# Altium PCB esp32s3.PcbDoc (part 1 of 3)
Units mm, origin at the board's own origin, x right, y up, seen from the top; angles counter-clockwise.
Board outline 131.57 x 101.6 mm, 2 copper layers (Top Layer, Bottom Layer); 173 components, 144 nets, 578 pads, 813 vias.
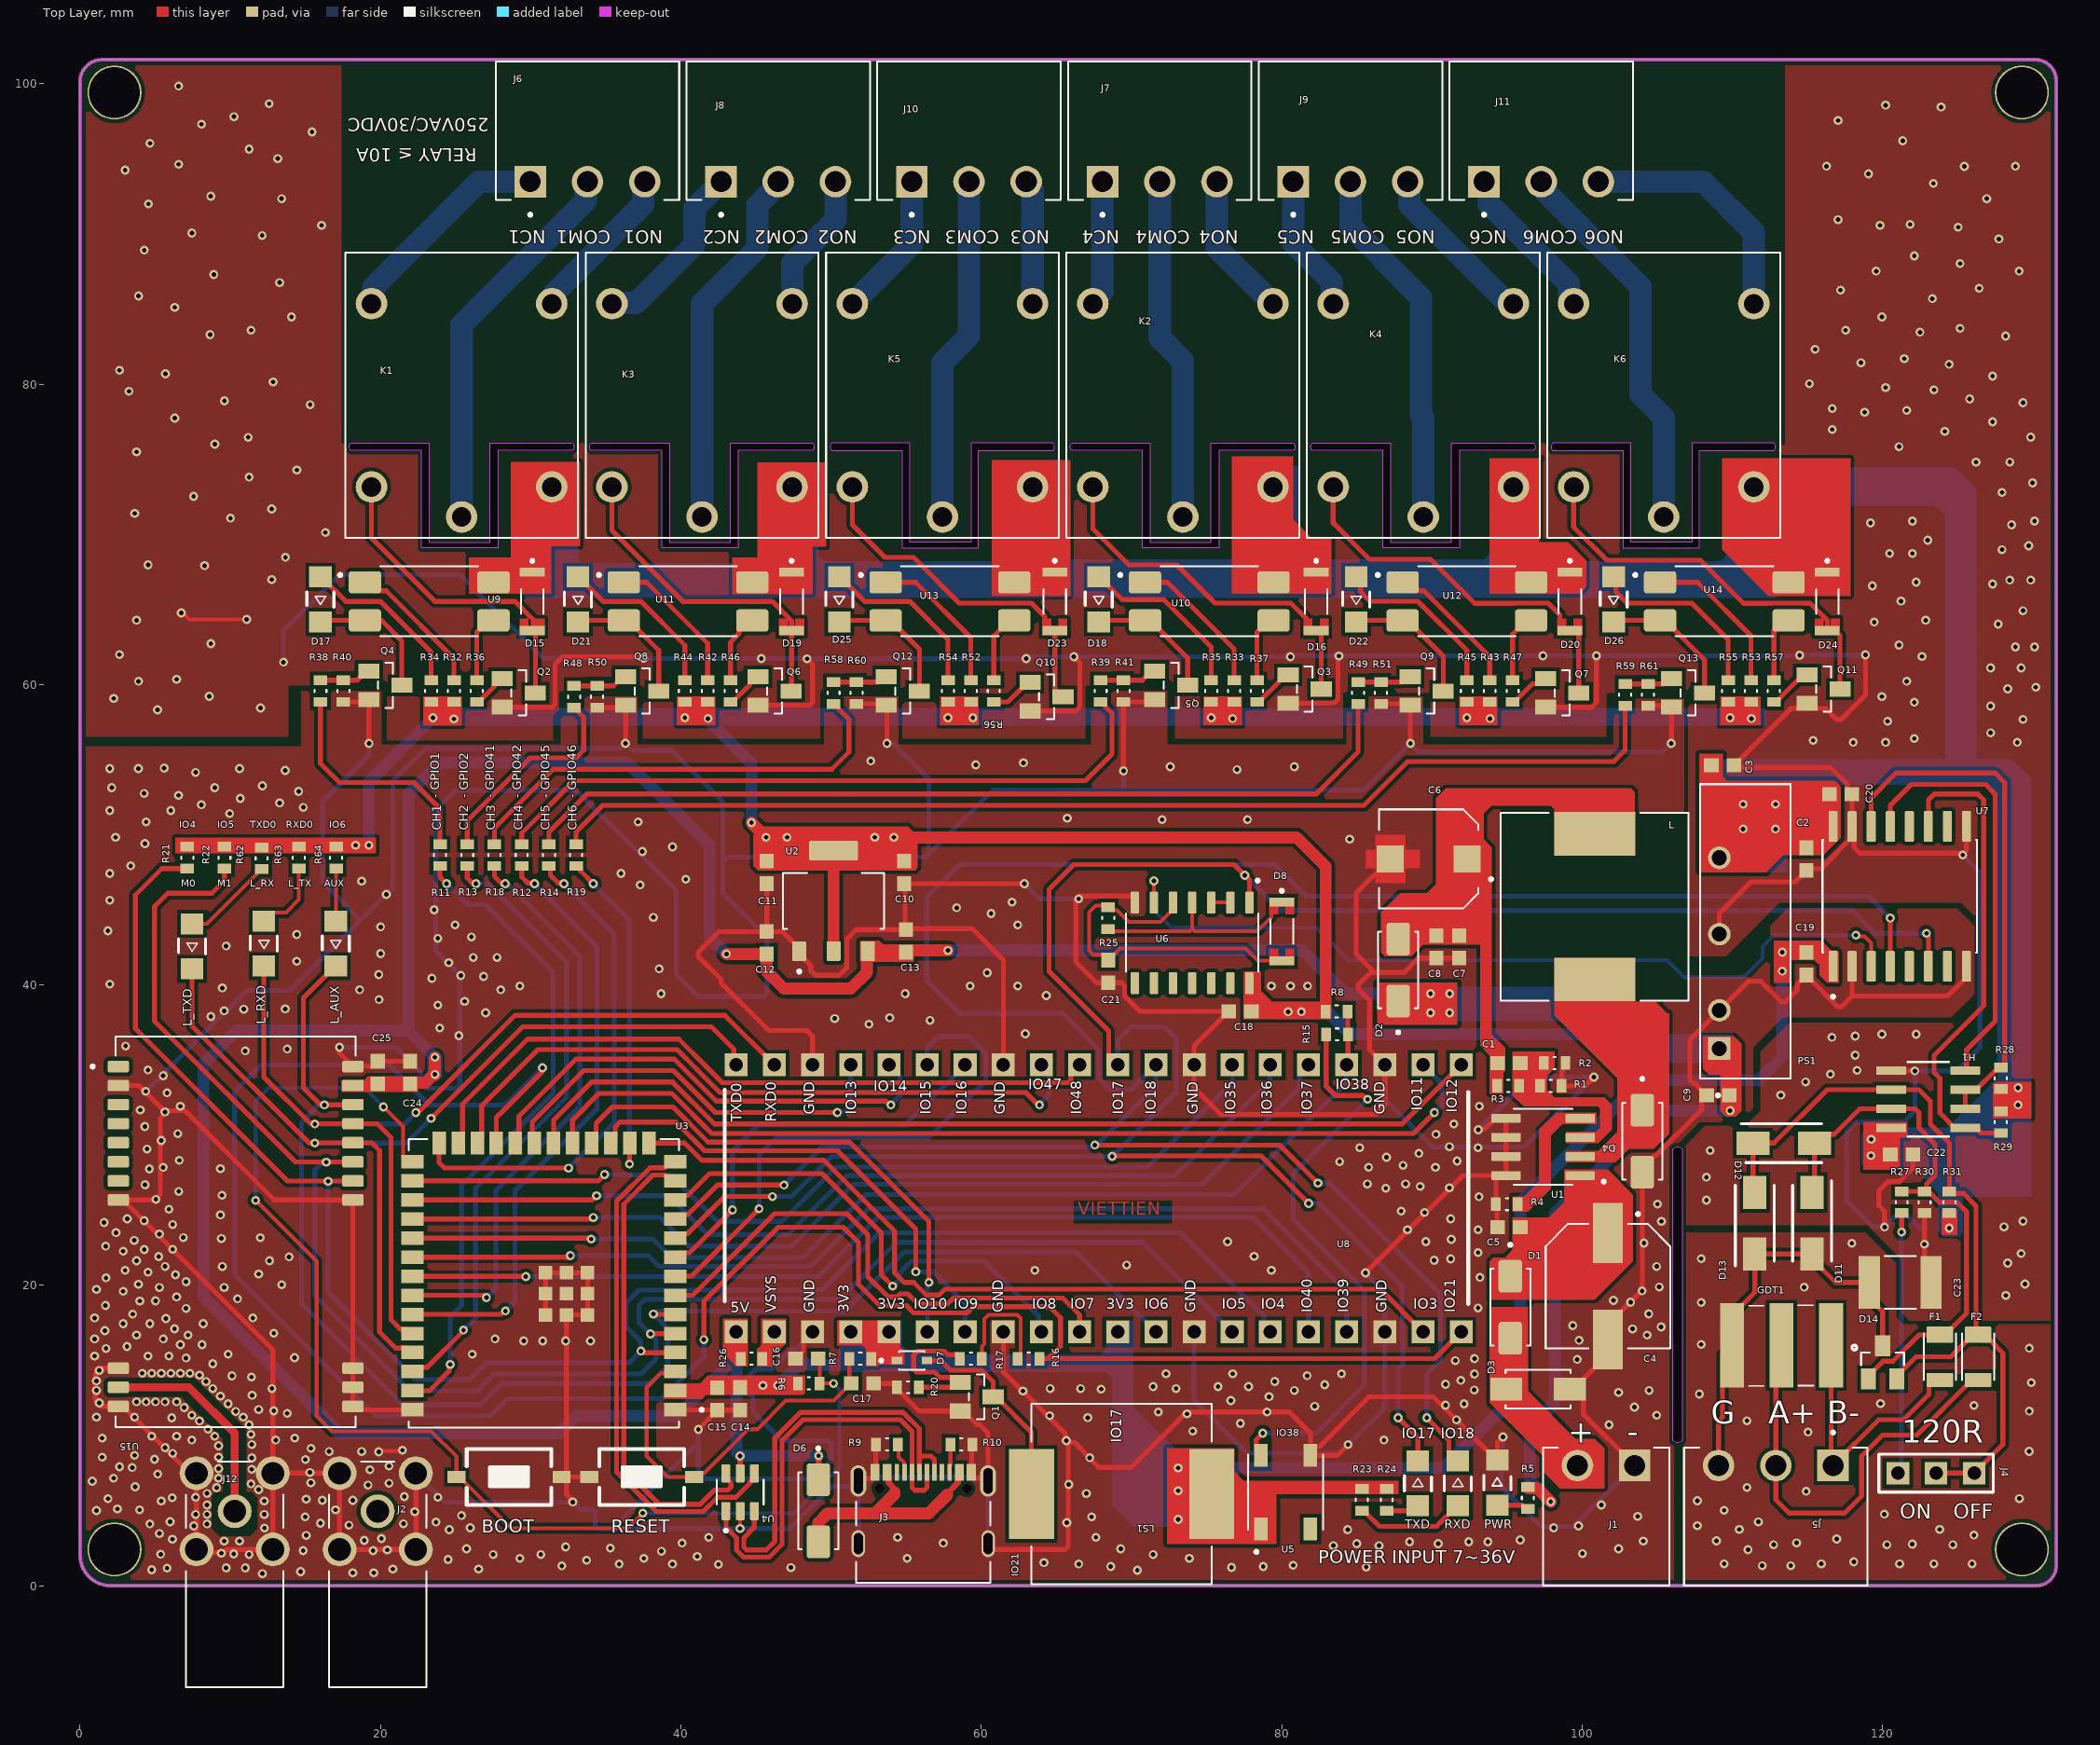
[diagram p0: Top Layer view]
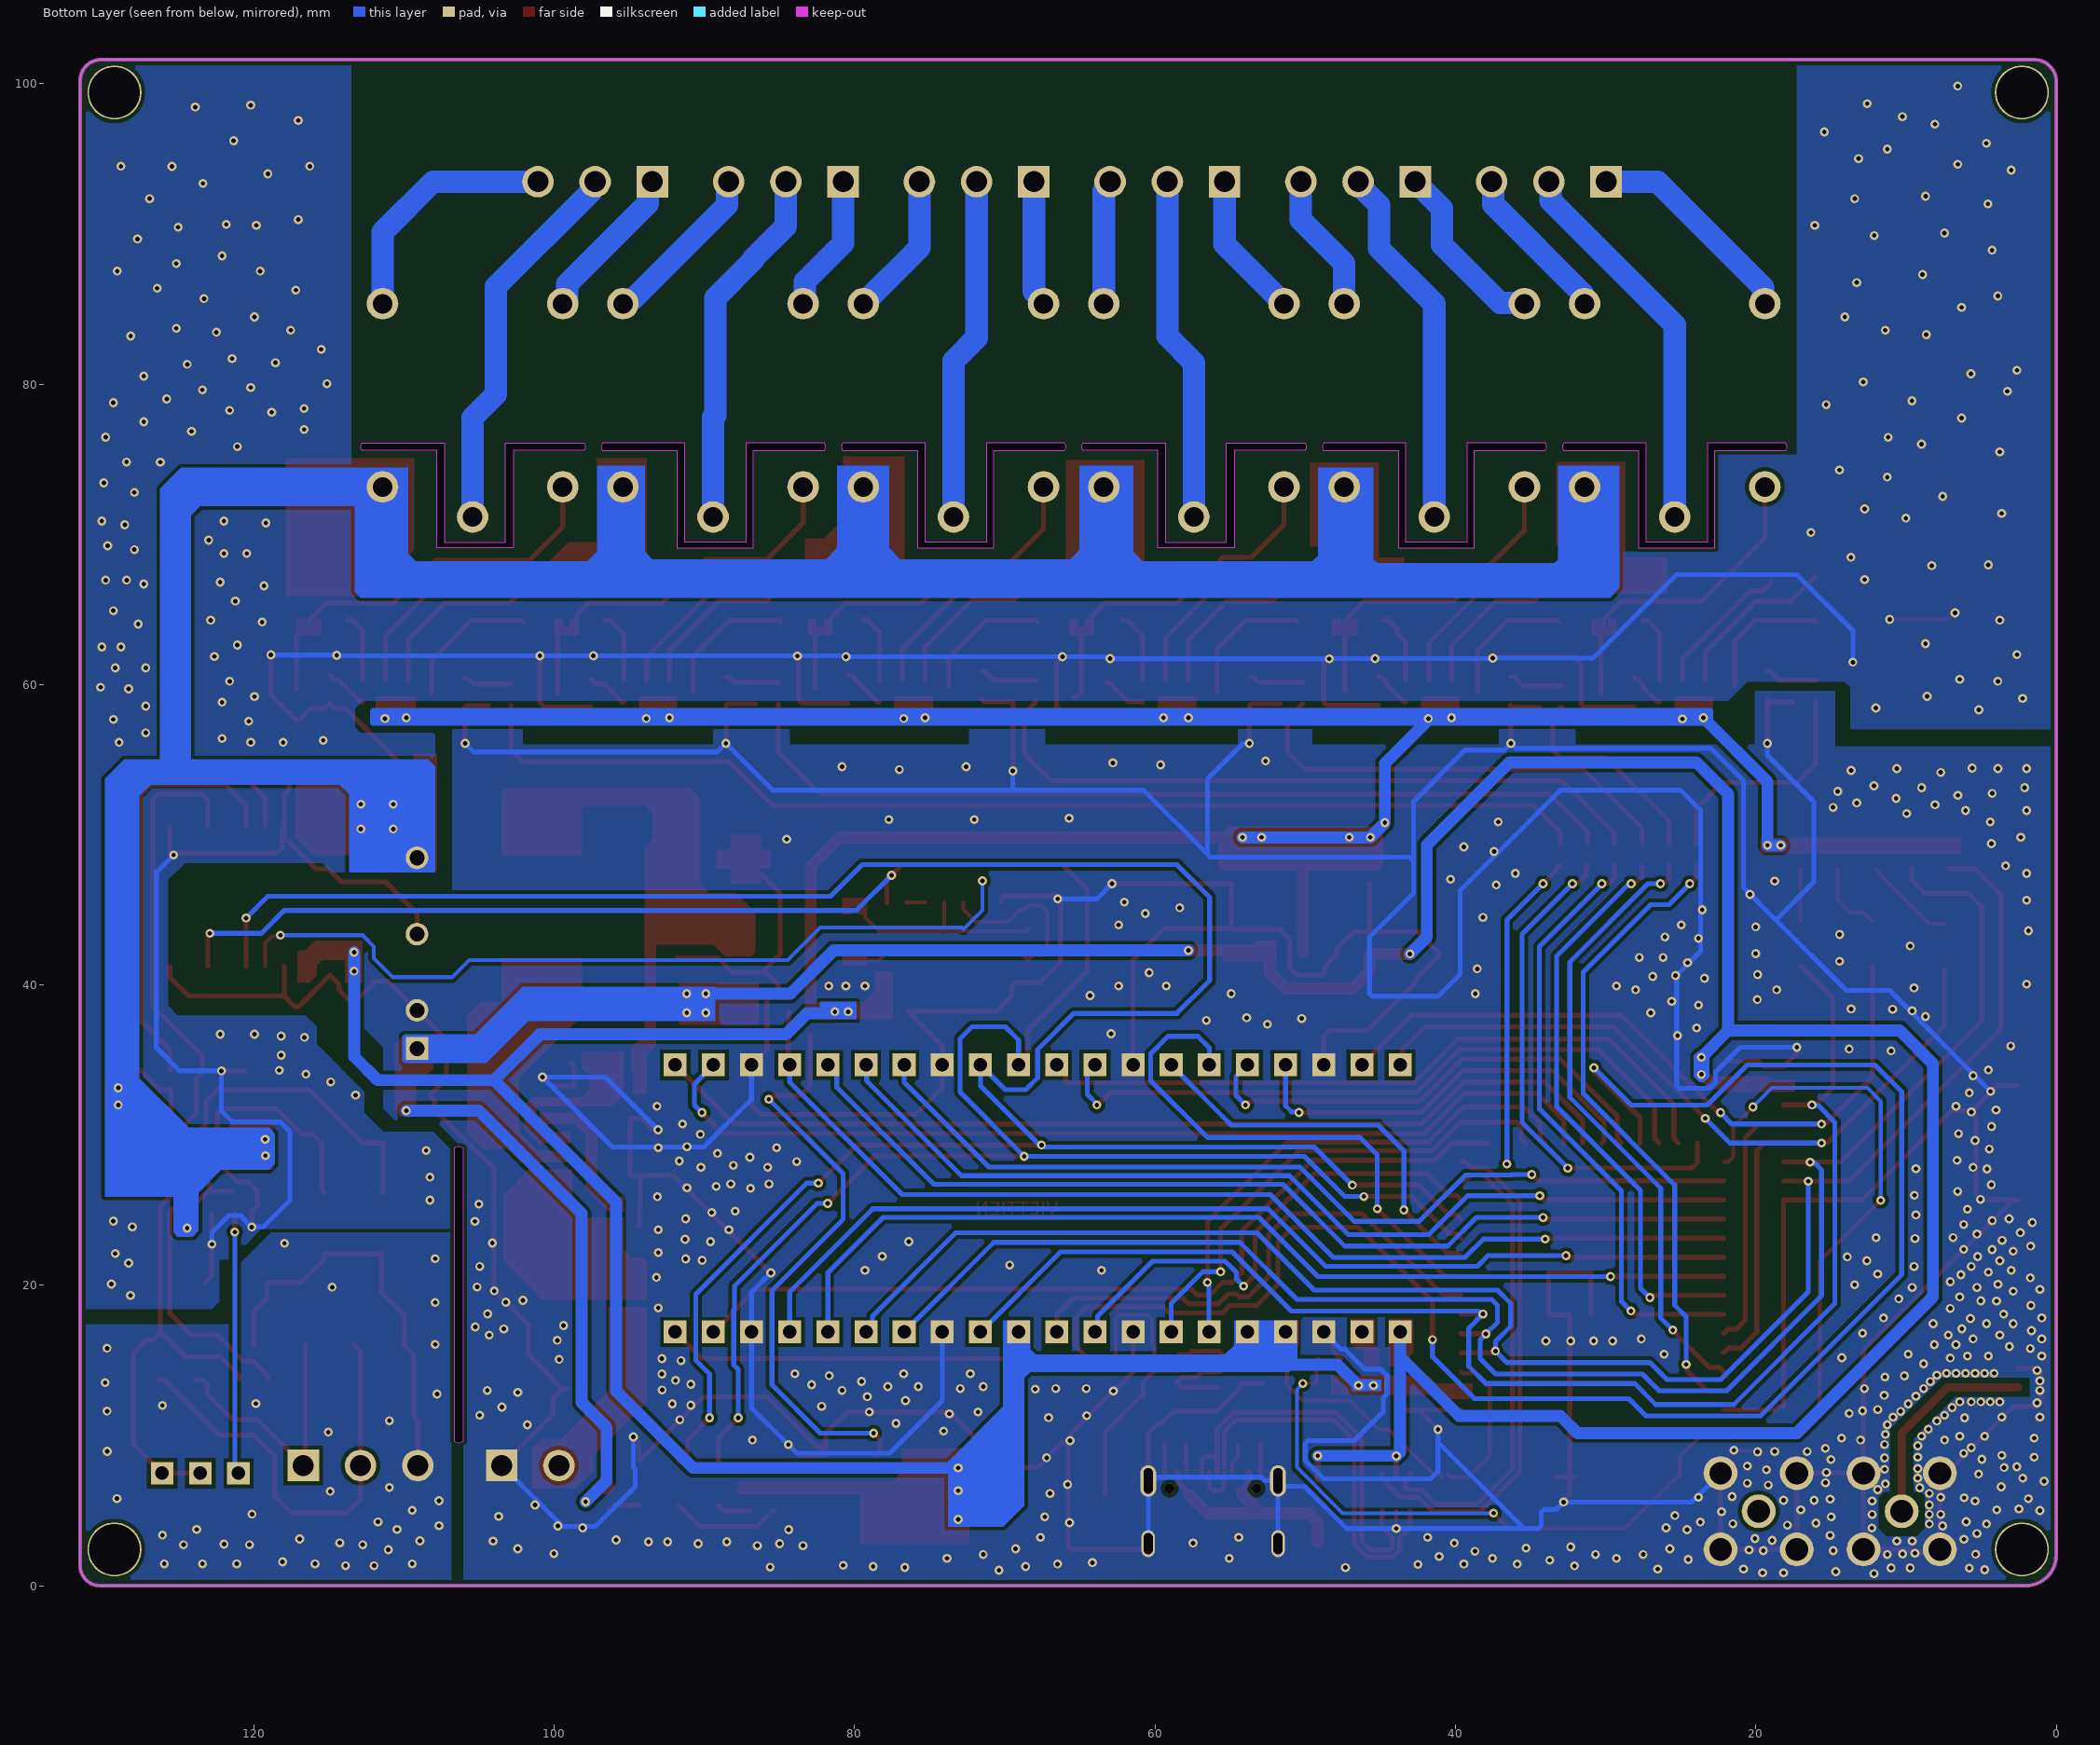
[diagram p1: Bottom Layer view, seen from below]
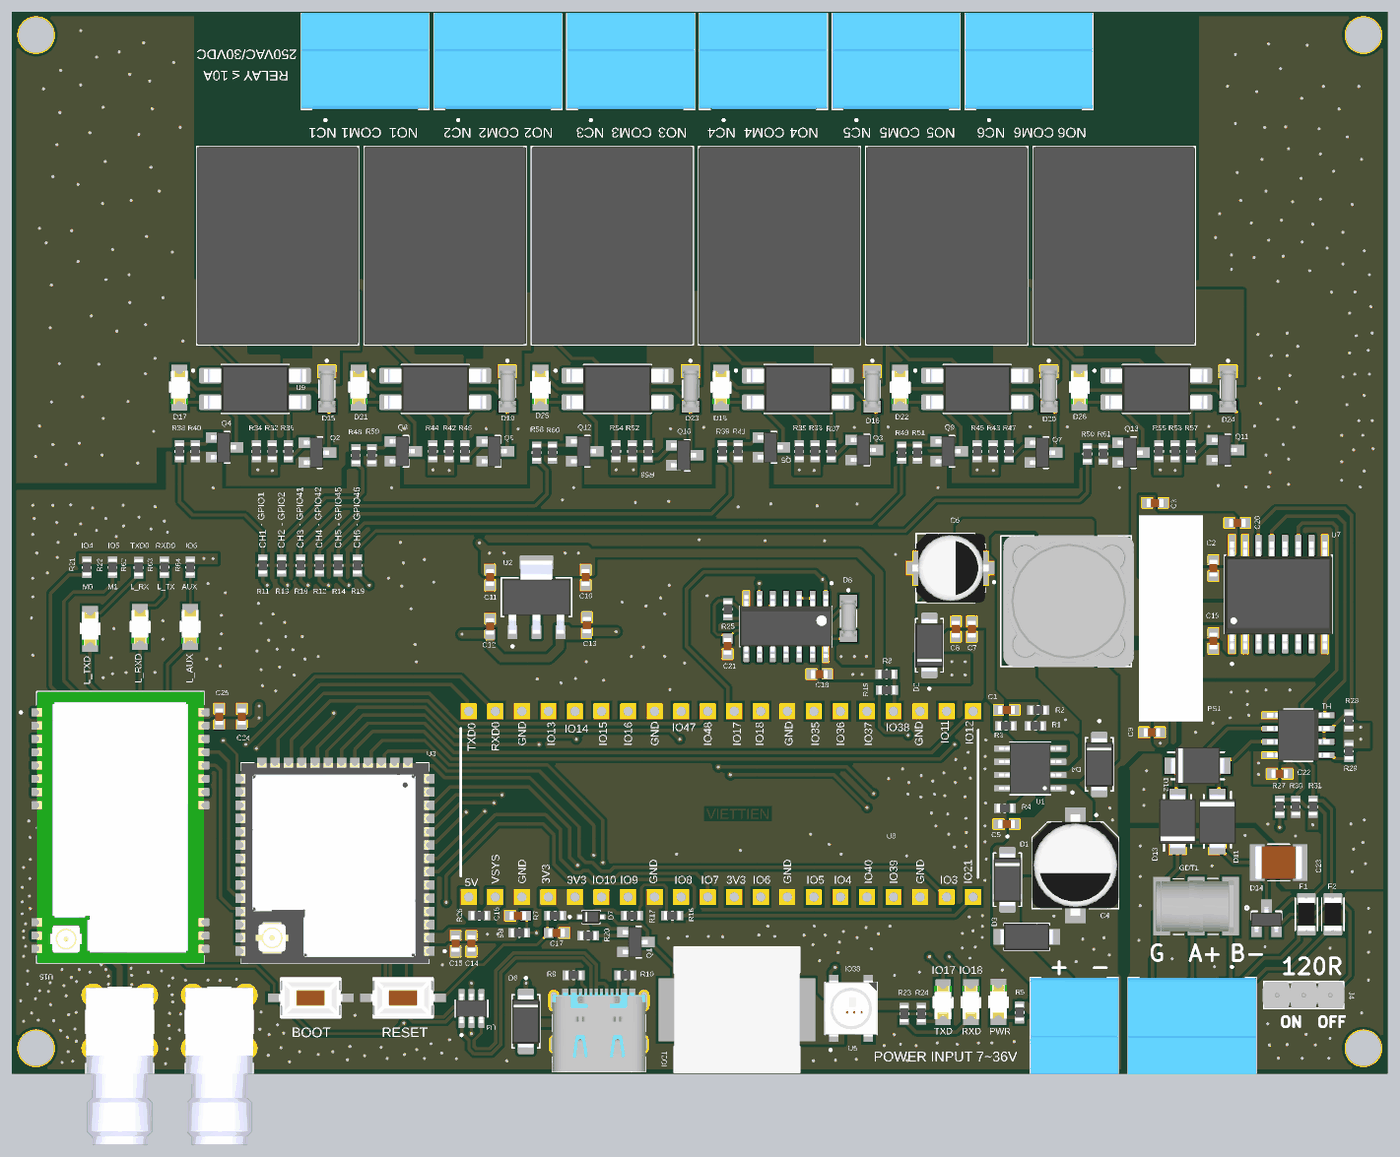
[diagram p4: 3D render of the assembled board from above, using the file's embedded part models]

## Layer stack, top to bottom
Top Solder: solder mask 0.0102, Solder Resist, Dk 3.5
Top Layer: signal copper 0.0356
Dielectric 1: dielectric 0.32, FR-4, Dk 4.8
Bottom Layer: signal copper 0.0356
Bottom Solder: solder mask 0.0102, Solder Resist, Dk 3.5

## Board outline
0,2.032 0,100.076 cw(c1.46,100.139) 1.397,101.6 130.175,101.6 cw(c130.175,100.203) 131.572,100.203 131.572,1.397 cw(c130.239,1.333) 130.302,0 2.032,0 cw(c2.032,2.032)
cut-out: 22.733,69.088 22.733,75.565 18.034,75.565 cw(c18.288,75.819) 18.034,76.073 23.241,76.073 23.241,69.469 27.305,69.469 27.305,76.073 32.766,76.073 cw(c32.512,75.819) 32.766,75.565 27.813,75.565 27.813,69.088
cut-out: 102.743,69.088 107.823,69.088 107.823,75.565 112.776,75.565 ccw(c112.522,75.819) 112.776,76.073 107.315,76.073 107.315,69.469 103.251,69.469 103.251,76.073 98.044,76.073 ccw(c98.298,75.819) 98.044,75.565 102.743,75.565
cut-out: 87.249,69.469 91.313,69.469 91.313,76.073 96.774,76.073 cw(c96.52,75.819) 96.774,75.565 91.821,75.565 91.821,69.088 86.741,69.088 86.741,75.565 82.042,75.565 cw(c82.296,75.819) 82.042,76.073 87.249,76.073
cut-out: 70.739,69.088 70.739,75.565 66.04,75.565 cw(c66.294,75.819) 66.04,76.073 71.247,76.073 71.247,69.469 75.311,69.469 75.311,76.073 80.772,76.073 cw(c80.518,75.819) 80.772,75.565 75.819,75.565 75.819,69.088
cut-out: 54.737,69.088 59.817,69.088 59.817,75.565 64.77,75.565 ccw(c64.516,75.819) 64.77,76.073 59.309,76.073 59.309,69.469 55.245,69.469 55.245,76.073 50.038,76.073 ccw(c50.292,75.819) 50.038,75.565 54.737,75.565
cut-out: 39.243,69.469 43.307,69.469 43.307,76.073 48.768,76.073 cw(c48.514,75.819) 48.768,75.565 43.815,75.565 43.815,69.088 38.735,69.088 38.735,75.565 34.036,75.565 cw(c34.29,75.819) 34.036,76.073 39.243,76.073
cut-out: 22.733,69.088 22.733,75.565 18.034,75.565 cw(c18.288,75.819) 18.034,76.073 23.241,76.073 23.241,69.469 27.305,69.469 27.305,76.073 32.766,76.073 cw(c32.512,75.819) 32.766,75.565 27.813,75.565 27.813,69.088
cut-out: 106.045,9.652 106.045,29.083 cw(c106.362,28.765) 106.68,29.083 106.68,9.652 cw(c106.362,9.97)

## Design rules (kind name [scope] priority, off if disabled: settings)
Clearance [All] p1: gap=0.154 ignorepadtopadclearanceinfootprint=FALSE
DiffPairsRouting USB [InDifferentialPair('USB')] p1: maxlimit=0.154 minlimit=0.154 mostfreqgap=0.154 toplayer_minwidth=0.2 toplayer_maxwidth=0.324 toplayer_prefwidth=0.324 bottomlayer_minwidth=0.2 bottomlayer_maxwidth=0.324 bottomlayer_prefwidth=0.324 impedanceprofiledriven=TRUE impedanceprofileid={312FD6F5-3F03-47FD-BD7B-1A8850FD91C1} impedanceprofilevalue=90.000000 maxuncoupledlength=12.7
DiffPairsRouting D [InDifferentialPair('D')] p2: maxlimit=0.154 minlimit=0.154 mostfreqgap=0.154 toplayer_minwidth=0.2 toplayer_maxwidth=0.324 toplayer_prefwidth=0.324 bottomlayer_minwidth=0.2 bottomlayer_maxwidth=0.324 bottomlayer_prefwidth=0.324 impedanceprofiledriven=TRUE impedanceprofileid={312FD6F5-3F03-47FD-BD7B-1A8850FD91C1} impedanceprofilevalue=90.000000 maxuncoupledlength=12.7
HoleSize [All] p1: absolutevalues=TRUE maxlimit=10 minlimit=0.025 maxpercent=80.000 minpercent=20.000
MinimumSolderMaskSliver [All] p1: minsoldermaskwidth=0.01
PolygonConnect [All] p1: connectstyle=Direct reliefconductorwidth=0.254 reliefentries=4 polygonreliefangle="90 Angle" airgapwidth=0.254
RoutingVias [All] p1: holewidth=0.3 width=0.6 viastyle="Through Hole" minholewidth=0.3 minwidth=0.6 maxholewidth=0.3 maxwidth=0.6
SilkToSolderMaskClearance [IsPad] p1: minsilkscreentomaskgap=0.01 clearancetoexposedcopper=TRUE
SolderMaskExpansion [All] p1: expansion=0 istentingtop=FALSE
SupplyNets "Schematic Supply Nets_5" [InNet('3V3')] p1: voltage=0.000
SupplyNets "Schematic Supply Nets_4" [InNet('GND')] p2: voltage=0.000
SupplyNets "Schematic Supply Nets_3" [InNet('SGND')] p3: voltage=0.000
SupplyNets "Schematic Supply Nets_2" [InNet('5V')] p4: voltage=0.000
SupplyNets "Schematic Supply Nets_1" [InNet('Earth')] p5: voltage=0.000
SupplyNets "Schematic Supply Nets" [InNet('Relay_5V')] p6: voltage=0.000
Width USB_5V [InNet('USB_5V')] p1: maxlimit=0.8 minlimit=0.4 preferedwidth=0.6
Width 3V3 [InNet('3V3')] p2: maxlimit=0.8 minlimit=0.4 preferedwidth=0.6
Width 5V [InNet('5V')] p3: maxlimit=0.8 minlimit=0.4 preferedwidth=0.6
Width ANT [InNet('ANT')] p4: maxlimit=0.535 minlimit=0.535 preferedwidth=0.535 impedanceprofiledriven=TRUE impedanceprofileid={162BC0DA-36BA-4534-9BC8-EDF4AD9C7F6B} impedanceprofilevalue=50.000000 minimp=50.000000 maximp=50.000000 favimp=50.000000
26 further rules are at their usual default settings.

## Classes and differential pairs
component class vi_dieu_khien: BOOT C14 C15 C16 C17 C18 C19 C20 C21 D6 D7 D8 J2 J3 LS1 Q1 R6 R7 R8 R9 R10 R11 R12 R13 R14 R15 R16 R17 R18 R19 R20 R21 R22 R23 R24 R25 R26 RESET RXD TXD U3 U4 U5 U6 U7 U8
component class RS_485: C22 C23 D11 D12 D13 D14 F1 F2 GDT1 H1 J4 J5 R27 R28 R29 R30 R31
component class Relay: D15 D16 D17 D18 D19 D20 D21 D22 D23 D24 D25 D26 J6 J7 J8 J9 J10 J11 K1 K2 K3 K4 K5 K6 Q2 Q3 Q4 Q5 Q6 Q7 Q8 Q9 Q10 Q11 Q12 Q13 R32 R33 R34 R35 R36 R37 R38 R39 R40 R41 R42 R43 R44 R45 R46 R47 R48 R49 R50 R51 R52 R53 R54 R55 R56 R57 R58 R59 R60 R61 U9 U10 U11 U12 U13 U14
component class nguon: C1 C2 C3 C4 C5 C6 C7 C8 C9 C10 C11 C12 C13 D1 D2 D3 D4 J1 L PS1 PWR R1 R2 R3 R4 R5 U1 U2
component class LoRa: C24 C25 J12 L_AUX L_RXD L_TXD R62 R63 R64 U15
differential pair USB: +USB_P -USB_N
differential pair D: +D_P -D_N

## Components (designator, comment, footprint, x,y, rotation, side; value= is the part's Value field where it differs from the comment)
BOOT "Nut Nhan 2 Chan SMD 3x6x2.5" PCBComponent_1 32.624,9.017 r180 top
C1 "3.3nF" CAPC1608X94N 95.135,34.798 r0 top
C2 "10uF" CAPC1608X94N 114.935,48.375 r90 top
C3 "100nF" CAPC1608X94N 109.359,54.61 r180 top
C4 "10uF/100V" CAP_EEEFN2A100P 101.727,19.939 r270 top
C5 "1uF/50V" CAPC1608X94N 95.135,23.876 r0 top
C6 "100uF/16V" CAP_EEETC1C101XV 89.789,48.387 r180 top
C7 "22uF" CAPC1608X94N 91.821,42.533 r90 top
C8 "22uF" CAPC1608X94N 90.297,42.533 r90 top
C9 "10uF" CAPC1608X94N 109.051,32.651 r0 top
C10 "10uF" CAPC1608X94N 54.864,47.486 r90 top
C11 "100nF" CAPC1608X94N 45.72,47.486 r90 top
C12 "10uF" CAPC1608X94N 45.72,42.799 r270 top
C13 "100nF" CAPC1608X94N 54.991,42.926 r270 top
C14 "1uF" CAPC1608X94N 43.942,12.446 r270 top
C15 "100nF" CAPC1608X94N 42.418,12.434 r270 top
C16 "100nF" CAPC1608X94N 48.387,15.113 r0 top
C17 "100nF" CAPC1608X94N 52.082,13.462 r180 top
C18 "100nF" CAPC1608X94N 77.228,38.227 r180 top
C19 "100nF" CAPC1608X94N 114.935,41.402 r270 top
C20 "100nF" CAPC1608X94N 117.221,52.705 r180 top
C21 "1nF" CAPC1608X94N 68.453,40.894 r90 top
C22 "100nF" CAPC1608X94N 121.273,28.702 r180 top
C23 "1nF/2kV" CAPC4532X155N 121.183,20.193 r180 top
C24 "1uF" CAPC1608X94N 21.971,34.163 r90 top
C25 "100nF" CAPC1608X94N 19.812,34.163 r90 top
D1 "B340A-E3/61T" DIOM5126X229N 95.223,18.542 r270 top
D2 "B340A-E3/61T" DIOM5126X229N 87.757,40.988 r90 top
D3 "SMAJ40CA" DIOM4325X250N 97.072,13.081 r180 top
D4 "B340A-E3/61T" DIOM5126X229N 104.013,29.591 r270 top
D6 "B340A-E3/61T" DIOM5126X229N 49.149,4.986 r270 top
D7 "1N4148WS_R9G" DIO_1N4148WS_R9G 55.388,14.986 r0 top
D8 "LL4148" DIO_LL4148 80.01,43.561 r270 top
D11 "SMAJ12CA" DIOM5026X229N 115.316,24.13 r270 top
D12 "SMAJ12CA" DIOM5026X229N 113.429,29.464 r0 top
D13 "SMAJ12CA" DIOM5026X229N 111.506,24.13 r90 top
D14 "SM712-02HTG" SOT23 120.015,14.859 r0 top
D15 "LL4148" DIO_LL4148 30.099,65.532 r270 top locked
D16 "LL4148" DIO_LL4148 82.296,65.532 r270 top locked
D17 "WL-SMCW_1206" WL-SMCW_1206 16.002,65.659 r90 top locked
D18 "WL-SMCW_1206" WL-SMCW_1206 67.818,65.659 r90 top locked
D19 "LL4148" DIO_LL4148 47.371,65.532 r270 top locked
D20 "LL4148" DIO_LL4148 99.187,65.532 r270 top locked
D21 "WL-SMCW_1206" WL-SMCW_1206 33.147,65.659 r90 top locked
D22 "WL-SMCW_1206" WL-SMCW_1206 84.963,65.659 r90 top locked
D23 "LL4148" DIO_LL4148 64.897,65.532 r270 top locked
D24 "LL4148" DIO_LL4148 116.332,65.532 r270 top locked
D25 "WL-SMCW_1206" WL-SMCW_1206 50.546,65.659 r90 top locked
D26 "WL-SMCW_1206" WL-SMCW_1206 102.108,65.659 r90 top locked
F1 "Fuse Thermal" RESC3115X65N 123.825,15.24 r270 top
F2 "Fuse Thermal" RESC3115X65N 126.365,15.24 r270 top
GDT1 "2038-15-SM-RPLF" TVS_2031-42T-SM-RPLF 114.634,16.002 r180 top
H1 "SP485EEN-L_TR" SOIC127P600X175-8N 123.063,32.385 r180 top
J1 "TBP02R1-381-02BE" CUI_TBP02R1-381-02BE 103.505,8.001 r180 top
J2 "85_SMA-50-0-144/111_YH" HUBER+SUHNER_85_SMA-50-0-144/111_YH 19.812,4.953 r0 top locked
J3 "TypeC_12pin_12402012E212A" TypeC_12pin_12402012E212A 56.134,2.794 r0 top
J4 "TS-103-G-AA" SAMTEC_TS-103-G-AA 123.571,7.493 r0 top
J5 "TBP02R1-381-03BE" CUI_TBP02R1-381-03BE 116.713,8.001 r180 top
J6 "TBP02R1-381-03BE" CUI_TBP02R1-381-03BE 29.972,93.472 r0 top locked
J7 "TBP02R1-381-03BE" CUI_TBP02R1-381-03BE 68.072,93.472 r0 top locked
J8 "TBP02R1-381-03BE" CUI_TBP02R1-381-03BE 42.672,93.472 r0 top locked
J9 "TBP02R1-381-03BE" CUI_TBP02R1-381-03BE 80.772,93.472 r0 top locked
J10 "TBP02R1-381-03BE" CUI_TBP02R1-381-03BE 55.372,93.472 r0 top locked
J11 "TBP02R1-381-03BE" CUI_TBP02R1-381-03BE 93.472,93.472 r0 top locked
J12 "85_SMA-50-0-144/111_YH" HUBER+SUHNER_85_SMA-50-0-144/111_YH 10.287,4.953 r0 top locked
K1 "RELAY-HLS8L-DC5V-S-C(5P-19X15MM)" REY5-19.0X15.0X15.0MM 25.4,79.252 r90 top locked
K2 "RELAY-HLS8L-DC5V-S-C(5P-19X15MM)" REY5-19.0X15.0X15.0MM 73.425,79.252 r90 top locked
K3 "RELAY-HLS8L-DC5V-S-C(5P-19X15MM)" REY5-19.0X15.0X15.0MM 41.408,79.252 r90 top locked
K4 "RELAY-HLS8L-DC5V-S-C(5P-19X15MM)" REY5-19.0X15.0X15.0MM 89.433,79.252 r90 top locked
K5 "RELAY-HLS8L-DC5V-S-C(5P-19X15MM)" REY5-19.0X15.0X15.0MM 57.416,79.252 r90 top locked
K6 "RELAY-HLS8L-DC5V-S-C(5P-19X15MM)" REY5-19.0X15.0X15.0MM 105.441,79.252 r90 top locked
L "47uH" Introdutor_47uH_12x12x7 100.838,45.212 r270 top
L_AUX "WL-SMCW_1206" WL-SMCW_1206 17.018,42.748 r90 top
L_RXD "WL-SMCW_1206" WL-SMCW_1206 12.234,42.748 r90 top
L_TXD "WL-SMCW_1206" WL-SMCW_1206 7.45,42.561 r90 top
LS1 "CMT-1203-SMT" CUI_CMT-1203-SMT 69.342,6.096 r270 top
PS1 "B0505LS-1WR3" CONV_RFB-0505S 110.871,43.561 r90 top
PWR "WL-SMCW_1206" WL-SMCW_1206 94.361,6.858 r270 top
Q1 "SS8050" SOT-23_BEC 59.69,12.573 r270 top
Q2 "SS8050" SOT-23_BEC 29.21,59.436 r270 top
Q3 "SS8050" SOT-23_BEC 81.534,59.69 r270 top
Q4 "SS8050" SOT-23_BEC 20.32,59.944 r270 top
Q5 "SS8050" SOT-23_BEC 72.644,59.944 r270 top
Q6 "SS8050" SOT-23_BEC 46.228,59.563 r270 top
Q7 "SS8050" SOT-23_BEC 98.679,59.436 r270 top
Q8 "SS8050" SOT-23_BEC 37.422,59.563 r270 top
Q9 "SS8050" SOT-23_BEC 89.662,59.563 r270 top
Q10 "SS8050" SOT-23_BEC 64.346,59.182 r270 top
Q11 "SS8050" SOT-23_BEC 116.078,59.69 r270 top
Q12 "SS8050" SOT-23_BEC 54.78,59.563 r270 top
Q13 "SS8050" SOT-23_BEC 107.061,59.436 r270 top
R1 "NC" RES_ERJU03J474V 97.917,33.274 r0 top
R2 "12K 1%" RES_ERJU03J474V 98.171,34.798 r0 top
R3 "41.2K 1%" RES_ERJU03J474V 95.086,33.274 r0 top
R4 "47K" RES_ERJU03J474V 94.996,25.4 r0 top
R5 "3.3K" RES_ERJU03J474V 96.393,5.842 r90 top
R6 "10K" RES_ERJU03J474V 48.514,13.462 r180 top
R7 "10K" RES_ERJU03J474V 51.943,15.113 r0 top
R8 "10K" RES_ERJU03J474V 83.656,38.227 r180 top
R9 "5K1" RES_ERJU03J474V 53.721,9.398 r0 top
R10 "5K1" RES_ERJU03J474V 58.674,9.398 r180 top
R11 "0R" RES_ERJU03J474V 23.965,48.641 r90 top
R12 "0R" RES_ERJU03J474V 29.398,48.641 r90 top
R13 "0R" RES_ERJU03J474V 25.776,48.641 r90 top
R14 "0R" RES_ERJU03J474V 31.209,48.641 r90 top
R15 "0R" RES_ERJU03J474V 83.693,36.703 r180 top
R16 "0R" RES_ERJU03J474V 63.156,15.113 r180 top
R17 "1K" RES_ERJU03J474V 59.309,15.113 r180 top
R18 "0R" RES_ERJU03J474V 27.587,48.641 r90 top
R19 "0R" RES_ERJU03J474V 33.02,48.641 r90 top
R20 "10K" RES_ERJU03J474V 55.118,13.208 r0 top
R21 "10K" RES_ERJU03J474V 7.131,48.467 r90 top
R22 "10K" RES_ERJU03J474V 9.607,48.467 r90 top
R23 "10K" RES_ERJU03J474V 85.344,5.715 r90 top
R24 "10K" RES_ERJU03J474V 86.995,5.715 r90 top
R25 "56K" RES_ERJU03J474V 68.453,44.45 r270 top
R26 "0R" RES_ERJU03J474V 44.704,15.113 r180 top
R27 "120R" RES_ERJU03J474V 121.285,25.527 r90 top
R28 "4K7" RES_ERJU03J474V 127.889,33.782 r270 top
R29 "10K" RES_ERJU03J474V 127.889,30.861 r90 top
R30 "4K7" RES_ERJU03J474V 122.809,25.527 r270 top
R31 "4K7" RES_ERJU03J474V 124.46,25.527 r90 top
R32 "4K7" RES_ERJU03J474V 24.892,59.563 r90 top
R33 "4K7" RES_ERJU03J474V 76.835,59.563 r90 top
R34 "2K" RES_ERJU03J474V 23.368,59.563 r90 top
R35 "2K" RES_ERJU03J474V 75.311,59.563 r90 top
R36 "4K7" RES_ERJU03J474V 26.416,59.563 r270 top
R37 "4K7" RES_ERJU03J474V 78.359,59.563 r270 top
R38 "4K7" RES_ERJU03J474V 16.002,59.563 r90 top
R39 "4K7" RES_ERJU03J474V 67.945,59.563 r90 top
R40 "100K" RES_ERJU03J474V 17.526,59.563 r270 top
R41 "100K" RES_ERJU03J474V 69.469,59.563 r270 top
R42 "4K7" RES_ERJU03J474V 41.783,59.563 r90 top
R43 "4K7" RES_ERJU03J474V 93.853,59.563 r90 top
R44 "2K" RES_ERJU03J474V 40.259,59.563 r90 top
R45 "2K" RES_ERJU03J474V 92.329,59.563 r90 top
R46 "4K7" RES_ERJU03J474V 43.307,59.563 r270 top
R47 "4K7" RES_ERJU03J474V 95.377,59.563 r270 top
R48 "4K7" RES_ERJU03J474V 32.893,59.182 r90 top
R49 "4K7" RES_ERJU03J474V 85.09,59.436 r90 top
R50 "100K" RES_ERJU03J474V 34.417,59.182 r270 top
R51 "100K" RES_ERJU03J474V 86.614,59.436 r270 top
R52 "4K7" RES_ERJU03J474V 59.309,59.563 r90 top
R53 "4K7" RES_ERJU03J474V 111.252,59.563 r90 top
R54 "2K" RES_ERJU03J474V 57.785,59.563 r90 top
R55 "2K" RES_ERJU03J474V 109.728,59.563 r90 top
R56 "4K7" RES_ERJU03J474V 60.833,59.563 r270 top
R57 "4K7" RES_ERJU03J474V 112.776,59.563 r270 top
R58 "4K7" RES_ERJU03J474V 50.165,59.436 r90 top
R59 "4K7" RES_ERJU03J474V 102.87,59.309 r90 top
R60 "100K" RES_ERJU03J474V 51.689,59.436 r270 top
R61 "100K" RES_ERJU03J474V 104.394,59.309 r270 top
R62 "10K" RES_ERJU03J474V 12.084,48.43 r90 top
R63 "10K" RES_ERJU03J474V 14.56,48.467 r90 top
R64 "10K" RES_ERJU03J474V 17.037,48.467 r90 top
RESET "Nut Nhan 2 Chan SMD 3x6x2.5" PCBComponent_1 33.33,5.461 r0 top
RXD "WL-SMCW_1206" WL-SMCW_1206 91.735,6.814 r270 top
TXD "WL-SMCW_1206" WL-SMCW_1206 89.068,6.814 r270 top
U1 "XL1509-ADJE1" SOIC127P599X175-8N 97.409,29.21 r180 top
U2 "AMS1117" SOT229P700X180-4N 50.165,45.593 r90 top
U3 "ESP32-S3-WROOM-1U-N4R2" XCVR_ESP32-S3-WROOM-1U-N4R2 30.885,20.121 r180 top
U4 "USBLC6-2SC6" USBLC6-2SC6 43.942,6.223 r90 top
U5 "WS2812B-B" LED_WS2812B-B 80.264,6.223 r90 top
U6 "74HC04D" SOP127P600X170-14N 74.041,42.799 r270 top
U7 "π141E61" SOIC127P1032X265-16N 121.158,45.891 r90 top
U8 "Pico HAT" Pico_HAT 43.688,16.891 r0 top
U9 "PC817X2NIP1B" SOIC254P960X420-4N 23.241,65.532 r0 top locked
U10 "PC817X2NIP1B" SOIC254P960X420-4N 75.184,65.532 r0 top locked
U11 "PC817X2NIP1B" SOIC254P960X420-4N 40.475,65.532 r0 top locked
U12 "PC817X2NIP1B" SOIC254P960X420-4N 92.329,65.532 r0 top locked
U13 "PC817X2NIP1B" SOIC254P960X420-4N 57.912,65.532 r0 top locked
U14 "PC817X2NIP1B" SOIC254P960X420-4N 109.474,65.532 r0 top locked
U15 "E32-433T20S" MODULE_E32-433T20S 10.35,23.568 r0 top locked

## Footprints (in the part's own frame and the unit in brackets; to place one, negate y for a bottom-side part, rotate by r counter-clockwise, add the part's x,y. Pads: shape width x height; smd on the part's side, far side on the other; paste and mask are expansions set on the pad)
CAP_EEEFN2A100P [mm]
  rect 4x2 smd: 1(-3.55,0) 2(3.55,0)
  silkscreen extent -4.9,-4.15 4.15,4.15, body extent -4.85,-4.15 4.85,4.15, height 10.2
CAP_EEETC1C101XV [mm]
  rect 1.8x1.8 smd paste-2 mask+0: 1(-2.55,0) 2(2.55,0)
  Top Layer region: 3.55,0.6 4.2,0.6 4.2,-0.6 3.55,-0.6 3.55,-1.6 1.55,-1.6 1.55,-0.6 0.6,-0.6 0.6,0.6 1.55,0.6 1.55,1.6 3.55,1.6
  Top Layer region: -1.55,0.6 -0.6,0.6 -0.6,-0.6 -1.55,-0.6 -1.55,-1.6 -3.55,-1.6 -3.55,-0.6 -4.2,-0.6 -4.2,0.6 -3.55,0.6 -3.55,1.6 -1.55,1.6
  silkscreen extent -4.25,-3.3 3.3,3.3, body extent -3.65,-3.3 3.65,3.3, height 8
CAPC1608X94N [mm]
  rect 0.97x0.94 smd paste+0 mask+0.102: 1(-0.75,0) 2(0.75,0)
  body extent -0.8,-0.4 0.8,0.4, height 0.94
CAPC4532X155N [mm]
  rect 1.4x3.51 smd: 1(-2.057,0) 2(2.057,0)
  silkscreen extent -1.04,-1.75 1.04,1.75, body extent -2.25,-1.6 2.25,1.6, height 1.55
CONV_RFB-0505S [mm]
  rect 1.508x1.508 / inner round 1.508 / far side rect 1.508x1.508 hole 1: 1(-7.8,1.73)
  round 1.508 hole 1: 2(-5.26,1.73) 4(-0.18,1.73) 6(4.9,1.73)
  silkscreen extent -11.02,-3 9.8,3, body extent -9.8,-3 9.8,3, height 9.7
CUI_CMT-1203-SMT [mm]
  rect 6x3 smd: 1(0,6) 2(0,-6)
  silkscreen extent -6,-6 6,6, body extent -6,-6 6,6, height 3.05
CUI_TBP02R1-381-02BE [mm]
  rect 2.1x2.1 / inner round 2.1 / far side rect 2.1x2.1 hole 1.4: 1(0,0)
  round 2.1 hole 1.4: 2(3.81,0)
  silkscreen extent -2.3,-1.2 6.11,8, body extent -2.31,-1.17 6.1,8.03, height 7.27
CUI_TBP02R1-381-03BE [mm]
  rect 2.1x2.1 / inner round 2.1 / far side rect 2.1x2.1 hole 1.4: 1(0,0)
  round 2.1 hole 1.4: 2(3.81,0) 3(7.62,0)
  silkscreen extent -2.3,-2.3 9.92,8, body extent -2.3,-1.14 9.92,8.06, height 7.4
DIO_1N4148WS_R9G [mm]
  rect 0.7x0.5 smd: A(1,0) C(-1,0)
  silkscreen extent -2.15,-0.63 0.85,0.63, body extent -1.25,-0.63 1.25,0.63, height 1.1
DIO_LL4148 [mm]
  rect 0.6x1.65 smd paste+0 mask+0.102: A(1.95,0) C(-1.95,0)
  Top Layer region: -1.15,0.25 -1.65,0.25 -1.65,-0.25 -1.15,-0.25 -1.15,-0.825 -2.24,-0.825 -2.24,0.825 -1.15,0.825
  Top Layer region: 2.25,-0.825 1.15,-0.825 1.15,-0.25 1.65,-0.25 1.65,0.25 1.15,0.25 1.15,0.825 2.25,0.825
  silkscreen extent -2.8,-0.75 0.83,0.75, body extent -1.75,-0.72 1.75,0.75, height 1.49
DIOM4325X250N [mm]
  rect 2.12x1.5 smd: 1(-2.115,0) 2(2.115,0)
  silkscreen extent -2.17,-1.28 2.16,1.28, body extent -2.57,-1.28 2.57,1.28, height 2.47
DIOM5026X229N [mm]
  rect 2.2x1.55 smd paste+0 mask+0.102: 1(-2.05,0) 2(2.05,0)
  silkscreen extent -2.82,-1.3 2.52,1.3, body extent -2.61,-1.78 2.61,1.78, height 2.43
DIOM5126X229N [mm]
  rrect25% 2.17x1.57 smd: A(2.065,0) C(-2.065,0)
  silkscreen extent -4.25,-1.33 2.55,1.33, body extent -2.55,-1.33 2.55,1.33, height 2.29
HUBER+SUHNER_85_SMA-50-0-144/111_YH [mm]
  round 2.25 hole 1.5: 1(0,0) G1(-2.54,2.54) G2(2.54,2.54) G3(-2.54,-2.54) G4(2.54,-2.54)
  silkscreen extent -3.25,-11.7 3.25,3.3, body extent -3.22,-11.77 3.23,3.23, height 9.9
Introdutor_47uH_12x12x7 [mm]
  rect 2.9x5.4 smd: 1(-4.85,0) 2(4.85,0)
  silkscreen extent -6.25,-6.25 6.25,6.25, body extent -6.25,-6 6.25,6.5, height 6
LED_WS2812B-B [mm]
  rect 1.5x0.9 smd: 1(-2.45,1.65) 2(-2.45,-1.65) 3(2.45,-1.65) 4(2.45,1.65)
  silkscreen extent -4.07,-2.5 2.5,2.5, body extent -2.7,-2.5 2.7,2.5, height 1.56
MODULE_E32-433T20S [mm]
  rrect25% 1.41x0.77 smd: 1(-7.81,11) 2(-7.81,9.73) 3(-7.81,8.46) 4(-7.81,7.19) 5(-7.81,5.92) 6(-7.81,4.65) 7(-7.81,3.38) 8(-7.81,2.11) 11(-7.81,-9.09) 12(-7.81,-10.36) 13(-7.81,-11.63) 14(7.81,-11.63) 15(7.81,-10.36) 16(7.81,-9.09) 19(7.81,2.11) 20(7.81,3.38) 21(7.81,4.65) 22(7.81,5.92) 23(7.81,7.19) 24(7.81,8.46) 25(7.81,9.73) 26(7.81,11)
  silkscreen extent -9.61,-13 8,13, body extent -8,-13 8,13, height 3.25
PCBComponent_1 [mm]
  rect 1.2x0.8 smd: 1(0.564,1.778) 2(7.564,1.778)
  silkscreen extent 1.24,-0.08 6.88,3.63, body extent 1.01,-0.07 7.11,3.63, height 2.5
Pico_HAT [mil]
  rect 60x60 hole 35.43: 1(0,0) 2(100,0) 3(200,0) 4(300,0) 5(400,0) 6(500,0) 7(600,0) 8(700,0) 9(800,0) 10(900,0) 11(1000,0) 12(1100,0) 13(1200,0) 14(1300,0) 15(1400,0) 16(1500,0) 17(1600,0) 18(1700,0) 19(1800,0) 20(1900,0) 21(1900,700) 22(1800,700) 23(1700,700) 24(1600,700) 25(1500,700) 26(1400,700) 27(1300,700) 28(1200,700) 29(1100,700) 30(1000,700) 31(900,700) 32(800,700) 33(700,700) 34(600,700) 35(500,700) 36(400,700) 37(300,700) 38(200,700) 39(100,700) 40(0,700)
  silkscreen extent -30,74 1919,635
RES_ERJU03J474V [mm]
  rect 0.65x0.9 smd: 1(-0.725,0) 2(0.725,0)
  silkscreen extent -0.08,-0.4 0.08,0.4, body extent -0.8,-0.4 0.8,0.4, height 0.45
RESC3115X65N [mm]
  rrect14% 1.09x1.77 smd: 1(-1.465,0)
  rrect14% 0.94x1.77 smd: 2(1.54,0)
  silkscreen extent -1.55,-1.06 1.55,1.06, body extent -1.6,-0.79 1.6,0.79, height 0.67
REY5-19.0X15.0X15.0MM [mm]
  round 2.1 hole 1.3: 1(-8.1,0) 2(-6.1,-6) 3(-6.1,6) 4(6.1,-6) 5(6.1,6)
  silkscreen extent -9.5,-7.75 9.5,7.75, body extent -9.5,-7.75 9.5,7.75, height 15.8
SAMTEC_TS-103-G-AA [mm]
  rect 1.5x1.5 / inner round 1.5 / far side rect 1.5x1.5 hole 0.9: 01(-2.54,0)
  rect 1.5x1.5 hole 0.9: 02(0,0) 03(2.54,0)
  silkscreen extent -3.81,-1.27 3.81,1.27, body extent -3.91,-1.27 3.91,1.27, height 8.28
SOIC127P599X175-8N [mm]
  rrect25% 1.97x0.6 smd: 1(-2.47,1.905) 2(-2.47,0.635) 3(-2.47,-0.635) 4(-2.47,-1.905) 5(2.47,-1.905) 6(2.47,-0.635) 7(2.47,0.635) 8(2.47,1.905)
  silkscreen extent -4.14,-2.53 1.95,2.53, body extent -3,-2.45 3,2.45, height 1.75
SOIC127P600X175-8N [mil]
  rect 78x22 smd paste+0 mask+4.02: 1(-97,75) 2(-97,25) 3(-97,-25) 4(-97,-75) 5(97,-75) 6(97,-25) 7(97,25) 8(97,75)
  silkscreen extent -54,-98 54,98, body extent -118,-96 118,96, height 68
SOIC127P1032X265-16N [mm]
  rrect25% 2.05x0.6 smd paste+0 mask+0.102: 1(-4.655,4.445) 2(-4.655,3.175) 3(-4.655,1.905) 4(-4.655,0.635) 5(-4.655,-0.635) 6(-4.655,-1.905) 7(-4.655,-3.175) 8(-4.655,-4.445) 9(4.655,-4.445) 10(4.655,-3.175) 11(4.655,-1.905) 12(4.655,-0.635) 13(4.655,0.635) 14(4.655,1.905) 15(4.655,3.175) 16(4.655,4.445)
  silkscreen extent -6.78,-5.15 3.75,5.15, body extent -5.29,-5.15 5.04,5.15, height 2.65
SOIC254P960X420-4N [mm]
  rrect25% 2.15x1.48 smd: 1(-4.28,1.27) 2(-4.28,-1.27) 3(4.28,-1.27) 4(4.28,1.27)
  silkscreen extent -6.03,-2.33 3.25,2.33, body extent -4.87,-2.29 4.87,2.29, height 4
SOP127P600X170-14N [mm]
  rrect25% 1.46x0.55 smd paste+0 mask+0.102: 1(-2.685,3.81) 2(-2.685,2.54) 3(-2.685,1.27) 4(-2.685,0) 5(-2.685,-1.27) 6(-2.685,-2.54) 7(-2.685,-3.81) 8(2.685,-3.81) 9(2.685,-2.54) 10(2.685,-1.27) 11(2.685,0) 12(2.685,1.27) 13(2.685,2.54) 14(2.685,3.81)
  silkscreen extent -4.24,-4.41 1.94,4.46, body extent -3,-4.41 3,4.41, height 1.7
SOT23 [mm]
  rect 1x1.4 smd: 1(-0.95,-1.1) 2(0.95,-1.1) 3(0,1.1)
  silkscreen extent -1.42,-0.15 1.42,0.66, body extent -1.46,-1.31 1.46,1.06, height 1.12
SOT229P700X180-4N [mm]
  rrect15% 1.31x0.93 smd: 1(-3.345,2.29) 2(-3.345,0) 3(-3.345,-2.29)
  rrect15% 1.31x3.24 smd: 2(3.345,0)
  silkscreen extent -4.8,-3.36 1.86,3.36, body extent -3.5,-3.25 3.5,3.25, height 1.8
SOT-23_BEC [mm]
  rect 1x1.4 smd: B(-0.95,-1.1) C(0,1.1) E(0.95,-1.1)
  silkscreen extent -1.5,-0.5 1.5,0.5, body extent -1.45,-1.3 1.45,1.1, height 1.14
TVS_2031-42T-SM-RPLF [mm]
  rect 1.6x5.6 smd: 1(-1.95,0) 2(1.35,0) 3(4.65,0)
  silkscreen extent -3.66,-2.67 3.53,2.69, body extent -2.29,-2.5 5.21,2.5, height 5
TypeC_12pin_12402012E212A [mm]
  rect 0.6x1.14 smd: A1_B12(-3.2,4.75) A4_B9(-2.4,4.75) B1_A12(3.2,4.75) B4_A9(2.4,4.75)
  rect 0.3x1.14 smd: A5(-1.25,4.75) A6(-0.25,4.75) A7(0.25,4.75) A8(1.25,4.75) B5(1.75,4.75) B6(0.75,4.75) B7(-0.75,4.75) B8(-1.75,4.75)
  oval 1.05x2.1 hole 0.6 slot 1.7 at 90 deg: SH1(-4.32,4.18) SH2(4.32,4.18)
  oval 0.9x1.8 hole 0.6 slot 1.4 at 90 deg: SH3(-4.32,0) SH4(4.32,0)
  round 0.65 hole 0.65 unplated: ""(-2.89,3.68) ""(2.89,3.68)
  silkscreen extent -4.47,-2.6 4.47,2.81, body extent -4.47,-2.65 4.47,4.95, height 3.15
USBLC6-2SC6 [mm]
  rrect25% 1.21x0.59 smd: 1(-1.255,0.95) 2(-1.255,0) 3(-1.255,-0.95) 4(1.255,-0.95) 5(1.255,0) 6(1.255,0.95)
  silkscreen extent -2.65,-1.57 0.81,1.57, body extent -1.4,-1.46 1.4,1.46, height 1.44
WL-SMCW_1206 [mm]
  rect 1.4x1.5 smd: 1(-1.5,0) 2(1.5,0)
  silkscreen extent -0.5,-0.9 0.5,0.9, body extent -1.6,-0.8 1.6,0.8, height 0.68
XCVR_ESP32-S3-WROOM-1U-N4R2 [mm]
  rect 1.5x0.9 smd: 1(-8.75,8.41) 2(-8.75,7.14) 3(-8.75,5.87) 4(-8.75,4.6) 5(-8.75,3.33) 6(-8.75,2.06) 7(-8.75,0.79) 8(-8.75,-0.48) 9(-8.75,-1.75) 10(-8.75,-3.02) 11(-8.75,-4.29) 12(-8.75,-5.56) 13(-8.75,-6.83) 14(-8.75,-8.1) 27(8.75,-8.1) 28(8.75,-6.83) 29(8.75,-5.56) 30(8.75,-4.29) 31(8.75,-3.02) 32(8.75,-1.75) 33(8.75,-0.48) 34(8.75,0.79) 35(8.75,2.06) 36(8.75,3.33) 37(8.75,4.6) 38(8.75,5.87) 39(8.75,7.14) 40(8.75,8.41)
  rect 0.9x1.5 smd: 15(-6.985,-9.35) 16(-5.715,-9.35) 17(-4.445,-9.35) 18(-3.175,-9.35) 19(-1.905,-9.35) 20(-0.635,-9.35) 21(0.635,-9.35) 22(1.905,-9.35) 23(3.175,-9.35) 24(4.445,-9.35) 25(5.715,-9.35) 26(6.985,-9.35)
  rect 0.9x0.9 smd: 41_1(-2.9,2.09) 41_2(-1.5,2.09) 41_3(-0.1,2.09) 41_4(-2.9,0.69) 41_5(-1.5,0.69) 41_6(-0.1,0.69) 41_7(-2.9,-0.71) 41_8(-1.5,-0.71) 41_9(-0.1,-0.71)
  silkscreen extent -10.6,-9.6 9,9.6, body extent -8.98,-9.6 9.02,9.6, height 3.35

## Part data
C1 C2 C3 C5 C7 C8 C9 C10 C11 C12 C13 C14 C15 C16 C17 C18 C19 C20 C21 C22 C24 C25: library part cap_0603_VJ0603D3R9DXCAP, "cap 0603 (1608 Metric)", Package="1608 Vishay Vitramon", Check_prices=https://www.snapeda.com/parts/VJ0603D3R9DXCAP/Vishay/view-part/?ref=eda, MF="Vishay Vitramon", MP=VJ0603D3R9DXCAP, SnapEDA_Link=https://www.snapeda.com/parts/VJ0603D3R9DXCAP/Vishay/view-part/?ref=snap
C4: library part EEEFN2A100P, "CAP ALUM 10UF 20% 100V SMD", Package="RADIAL-2 Panasonic", Check_prices=https://www.snapeda.com/parts/EEEFN2A100P/Panasonic/view-part/?ref=eda, MF=Panasonic, MP=EEEFN2A100P, SnapEDA_Link=https://www.snapeda.com/parts/EEEFN2A100P/Panasonic/view-part/?ref=snap
C6: library part EEETC1C101XV, "CAP ALUM 100UF 20% 16V SMD", Package="RADIAL-2 Panasonic", Availability="In Stock", Check_prices=https://www.snapeda.com/parts/EEETC1C101XV/Panasonic/view-part/?ref=eda, MF=Panasonic, MP=EEETC1C101XV, Price=None, Purchase-URL=https://pricing.snapeda.com/search/part/EEETC1C101XV/?ref=eda, SnapEDA_Link=https://www.snapeda.com/parts/EEETC1C101XV/Panasonic/view-part/?ref=snap
C23: library part C1812C102KGRACAUTO, "1000 pF Â±10% 2000V (2kV) Ceramic Capacitor X7R 1812 (4532 Metric)", Package="4532 KEMET", Check_prices=https://www.snapeda.com/parts/C1812C102KGRACAUTO/KEMET/view-part/?ref=eda, MF=KEMET, MP=C1812C102KGRACAUTO, SnapEDA_Link=https://www.snapeda.com/parts/C1812C102KGRACAUTO/KEMET/view-part/?ref=snap
D1 D2 D4 D6: "Diode Schottky 40 V 3A Surface Mount DO-214AC (SMA)", Package="DO-214 Vishay Semiconductor", Check_prices=https://www.snapeda.com/parts/B340A-E3/61T/Vishay/view-part/?ref=eda, MF="Vishay Semiconductor", MP=B340A-E3/61T, SnapEDA_Link=https://www.snapeda.com/parts/B340A-E3/61T/Vishay/view-part/?ref=snap
D3: "Transient Voltage Suppressor, TVS, Transil SMAJ Series, Bidirectional, 40 V, DO-214AC, 2, 44.4 V", Package="DO-214 STMicroelectronics", Check_prices=https://www.snapeda.com/parts/SMAJ40CA-TR/STMicroelectronics/view-part/?ref=eda, MF=STMicroelectronics, MP=SMAJ40CA-TR, SnapEDA_Link=https://www.snapeda.com/parts/SMAJ40CA-TR/STMicroelectronics/view-part/?ref=snap
D7: "150mA, 100V High Speed SMD Switching Diode", Package="SOD-323F Taiwan Semiconductor", Check_prices=https://www.snapeda.com/parts/1N4148WS%20R9G/Taiwan+Semiconductor/view-part/?ref=eda, MF="Taiwan Semiconductor", MP="1N4148WS R9G", SnapEDA_Link=https://www.snapeda.com/parts/1N4148WS%20R9G/Taiwan+Semiconductor/view-part/?ref=snap
D8 D15 D16 D19 D20 D23 D24: "Small Signal Diode, SOD-80, 100V, 0.15A, 175Â°C", Package="SOD-80 Diotec", Check_prices=https://www.snapeda.com/parts/LL4148/Diotec/view-part/?ref=eda, MF="Diotec Semiconductor", MP=LL4148, SnapEDA_Link=https://www.snapeda.com/parts/LL4148/Diotec/view-part/?ref=snap
D11 D12 D13: "19.9V Clamp 20.1A Ipp Tvs Diode Surface Mount SMAJ (DO-214AC)", Package="DO-214 AVX", Check_prices=https://www.snapeda.com/parts/SMAJ12CA/AVX/view-part/?ref=eda, MF=AVX, MP=SMAJ12CA, SnapEDA_Link=https://www.snapeda.com/parts/SMAJ12CA/AVX/view-part/?ref=snap
D14: "TVS Diode, SM712 Series, 31V Clamp, 600W Peak Pulse, Surface Mount, SOT23-3", Package="SOT-23 Littelfuse Inc.", Check_prices=https://www.snapeda.com/parts/SM712-02HTG/Littelfuse/view-part/?ref=eda, MF="Littelfuse Inc.", MP=SM712-02HTG, SnapEDA_Link=https://www.snapeda.com/parts/SM712-02HTG/Littelfuse/view-part/?ref=snap
D17 D18 D21 D22 D25 D26 L_AUX L_RXD L_TXD PWR RXD TXD: "1206, Blue Typ.(@20mA): 470nm, 145mcd, 3.2V, 140Â° InGaN", Package="1206 Wurth Electronics", Check_prices=https://www.snapeda.com/parts/150120BS75000/Wurth+Electronics/view-part/?ref=eda, MF="Wurth Electronics", MP=150120BS75000, SnapEDA_Link=https://www.snapeda.com/parts/150120BS75000/Wurth+Electronics/view-part/?ref=snap
F1 F2: "Fuse, Resettable, Fast Acting, 10A, Sz 1206, 0.134x0.071x0.033\", SMT, 24VDC, PCB"
GDT1: "Gas Tube, 3 Electr, 150V, 10kA, 5 mm, SMT, Reel pack, 2038 Series", Package=None, Check_prices=https://www.snapeda.com/parts/2031-42T-SM-RPLF/Bourns/view-part/?ref=eda, MF=Bourns, MP=2031-42T-SM-RPLF, SnapEDA_Link=https://www.snapeda.com/parts/2031-42T-SM-RPLF/Bourns/view-part/?ref=snap
H1: "SP485E Series 10Mbps 5V Enhanced Low EMI Half Duplex RS-485 Transceiver -NSOIC-8", Package="SOIC-8 Exar", Check_prices=https://www.snapeda.com/parts/SP485EEN-L/TR/MaxLinear/view-part/?ref=eda, MF="MaxLinear, Inc.", MP=SP485EEN-L/TR, SnapEDA_Link=https://www.snapeda.com/parts/SP485EEN-L/TR/MaxLinear/view-part/?ref=snap
J1 J5 J6 J7 J8 J9 J10 J11: "2~24 Poles, Pluggable,Receptacle, Horizontal, 3.81 Pitch, Terminal Block Connector", Package=None, MF="Same Sky"
  J1: Check_prices=https://www.snapeda.com/parts/TBP02R1-381-02BE/Same+Sky/view-part/?ref=eda, MP=TBP02R1-381-02BE, SnapEDA_Link=https://www.snapeda.com/parts/TBP02R1-381-02BE/Same+Sky/view-part/?ref=snap
  J5 J6 J7 J8 J9 J10 J11: Check_prices=https://www.snapeda.com/parts/TBP02R1-381-03BE/Same+Sky/view-part/?ref=eda, MP=TBP02R1-381-03BE, SnapEDA_Link=https://www.snapeda.com/parts/TBP02R1-381-03BE/Same+Sky/view-part/?ref=snap
J2 J12: "RF Connector, SMA Right angle PCB jack(f)", Package=None, Check_prices=https://www.snapeda.com/parts/85_SMA-50-0-144/111_YH/Huber%252BSuhner/view-part/?ref=eda, MF=HUBER+SUHNER, MP=85_SMA-50-0-144/111_YH, SnapEDA_Link=https://www.snapeda.com/parts/85_SMA-50-0-144/111_YH/Huber%252BSuhner/view-part/?ref=snap
J3: "USB2.0, Type C, Top mount, CH 1.68mm, Dual Row SMT", Package=None, Availability="In Stock", Check_prices=https://www.snapeda.com/parts/12402012E212A/Amphenol/view-part/?ref=eda, MF="Amphenol ICC (Commercial Products)", MP=12402012E212A, Price=None, Purchase-URL=https://pricing.snapeda.com/search/part/12402012E212A/?ref=eda, SnapEDA_Link=https://www.snapeda.com/parts/12402012E212A/Amphenol/view-part/?ref=snap
J4: "Conn Unshrouded Header HDR 3 POS 2.54mm Solder ST Thru-Hole Bulk", Package=None, Availability="In Stock", Check_prices=https://www.snapeda.com/parts/TS-103-G-AA/Samtec/view-part/?ref=eda, MF=Samtec, MP=TS-103-G-AA, Price=None, Purchase-URL=https://pricing.snapeda.com/search/part/TS-103-G-AA/?ref=eda, SnapEDA_Link=https://www.snapeda.com/parts/TS-103-G-AA/Samtec/view-part/?ref=snap
K1 K2 K3 K4 K5 K6: "DIP Power Relay 5V-7A;", Package=None, Check_prices=https://www.snapeda.com/parts/HLS8L-DC5V-S-C/Helishun/view-part/?ref=eda, MF=Helishun, MP=HLS8L-DC5V-S-C, SnapEDA_Link=https://www.snapeda.com/parts/HLS8L-DC5V-S-C/Helishun/view-part/?ref=snap
L: library part Introdutor_47uH_12x12x7SRR1260-470M, "47ÂµH Shielded Wirewound Inductor 2.6A 86mOhm Max Nonstandard", Package="Nonstandard Bourns", Availability=Unavailable, MF=Bourns, MP=SRR1260-470M, Price=None, SnapEDA_Link=https://www.snapeda.com/parts/SRR1260-470M/Bourns/view-part/283129/?ref=snap
LS1: "12 mm, 25 V, 81 dB, Surface Mount (SMT), Piezo Audio Transducer Buzzer", Package="CUI Inc.", Check_prices=https://www.snapeda.com/parts/CMT-1203-SMT-TR/Same+Sky/view-part/?ref=eda, MF="Same Sky", MP=CMT-1203-SMT-TR, SnapEDA_Link=https://www.snapeda.com/parts/CMT-1203-SMT-TR/Same+Sky/view-part/?ref=snap
PS1: "1W DC/DC-Converter 'ECONOLINE' SIP7 1kV unreg", Package="SIP-6 Recom Power", Check_prices=https://www.snapeda.com/parts/RFB-0505S/Recom+Power/view-part/?ref=eda, MF="Recom Power", MP=RFB-0505S, SnapEDA_Link=https://www.snapeda.com/parts/RFB-0505S/Recom+Power/view-part/?ref=snap
Q1 Q2 Q3 Q4 Q5 Q6 Q7 Q8 Q9 Q10 Q11 Q12 Q13: "NPN Epitaxial Silicon Transistor", Package="TO-92-3 ON Semiconductor", Check_prices=https://www.snapeda.com/parts/SS8050/Fairchild+Semiconductor/view-part/?ref=eda, MF="ON Semiconductor / Fairchild", MP=SS8050, SnapEDA_Link=https://www.snapeda.com/parts/SS8050/Fairchild+Semiconductor/view-part/?ref=snap
R1 R2 R3 R4 R5 R6 R7 R8 R9 R10 R11 R12 R13 R14 R15 R16 R17 R18 R19 R20 R21 R22 R23 R24 R25 R26 R27 R28 R29 R30 R31 R32 R33 R34 R35 R36 R37 R38 R39 R40 R41 R42 R43 R44 R45 R46 R47 R48 R49 R50 R51 R52 R53 R54 R55 R56 R57 R58 R59 R60 R61 R62 R63 R64: library part res_0603_ERJU03J474V, "0603 Anti-Sulfurated", Package="1608-2 Panasonic", Check_prices=https://www.snapeda.com/parts/ERJU03J474V/Panasonic/view-part/?ref=eda, MF=Panasonic, MP=ERJU03J474V, SnapEDA_Link=https://www.snapeda.com/parts/ERJU03J474V/Panasonic/view-part/?ref=snap
U1: "2A 150KHz 40V Buck DC to DC Converter", Package="SOIC-8 Texas Instruments", Check_prices=https://www.snapeda.com/parts/LM358DR/Texas+Instruments/view-part/?ref=eda, MF="Texas Instruments", MP=LM358DR, SnapEDA_Link=https://www.snapeda.com/parts/LM358DR/Texas+Instruments/view-part/?ref=snap
U2: "1A LOW DROPOUT VOLTAGE REGULATOR SOT-223", Package="SOT-223 Seeed Technology", Check_prices=https://www.snapeda.com/parts/AMS1117/Advanced+Monolithic+Systems/view-part/?ref=eda, MF="Advanced Monolithic Systems", MP=AMS1117, SnapEDA_Link=https://www.snapeda.com/parts/AMS1117/Advanced+Monolithic+Systems/view-part/?ref=snap
U3: Package=None, Availability=Unavailable, MF="{'manufacturer': u'Espressif Systems'}", MP=ESP32-S3-WROOM-1U-N4R2, Price=None
U4: "17V Clamp 5A (8/20Âµs) Ipp Tvs Diode Surface Mount SOT-23-6", Package="SOT-23-6 STMicroelectronics", Availability="In Stock", Check_prices=https://www.snapeda.com/parts/USBLC6-2SC6/STMicroelectronics/view-part/?ref=eda, MF=STMicroelectronics, MP=USBLC6-2SC6, Price=None, Purchase-URL=https://pricing.snapeda.com/search/part/USBLC6-2SC6/?ref=eda, SnapEDA_Link=https://www.snapeda.com/parts/USBLC6-2SC6/STMicroelectronics/view-part/?ref=snap
U5: "Intelligent control LED integrated light source", Package=None, Availability=Unavailable, MP=WS2812B-B, Price=None
U6: "Hex Inverters", Package="SOP-14 TAEJIN", Check_prices=https://www.snapeda.com/parts/74HC04D/TAEJIN/view-part/?ref=eda, MF=TAEJIN, MP=74HC04D, SnapEDA_Link=https://www.snapeda.com/parts/74HC04D/TAEJIN/view-part/?ref=snap
U7: library part 141E61, "4-Channel Digital Isolator, 3 Forward/1 Reverse, 5kVrms Isolation, SOIC-16 Wide , (300mil), SMD,π141E61"
U9 U10 U11 U12 U13 U14: "Optocoupler DC-IN 1-CH Transistor DC-OUT 4-Pin DIP SMD T/R", Package="SMD-4 Sharp Microelectronics", Check_prices=https://www.snapeda.com/parts/PC817X2NIP1B/Sharp+Microelectronics/view-part/?ref=eda, MF="Sharp Microelectronics", MP=PC817X2NIP1B, SnapEDA_Link=https://www.snapeda.com/parts/PC817X2NIP1B/Sharp+Microelectronics/view-part/?ref=snap
U15: "Wireless serial port module (UART)", Package=Package, Availability="Not in stock", Check_prices=https://www.snapeda.com/parts/E32-433T20S/EBYTE/view-part/?ref=eda, MF=EBYTE, MP=E32-433T20S, Price=None, SnapEDA_Link=https://www.snapeda.com/parts/E32-433T20S/EBYTE/view-part/?ref=snap
BOOT RESET: Ma_Hang=MH001036, Ten="Nút Nhấn 2 Chân 3x6x2.5MM SMD"

## Free pads (board coordinates)
  round 3.6 hole 3.4: 2(2.286,2.413) 2(2.286,99.413) 2(129.286,2.413) 2(129.286,99.413)

## Via types
v1: diameter 0.6, hole 0.3, Top Layer to Bottom Layer, tented both sides, 813 vias

## Nets (pads, with @x,y where several pads share a name; then routed paths per layer and width w, separated by ;. In a path a pad name is that pad's centre, name@x,y a point inside that pad or via, vN(x,y) a via of type N, cw(c..) or ccw(c..) an arc to the next point about the centre after c; other vN are vias at no path point)
3A: C21.2 D8.A R25.1 U6.5 | length 23.3
  Top Layer w0.254: C21.2@68.453,41.644 C21.2@68.453,41.659 ; U6.5@72.771,45.484 72.771,45.029 71.938,44.196 69.811,44.196 69.03,44.977 68.725,44.977 68.432,45.27 67.622,45.27 67.183,44.831 67.183,42.291 67.472,42.002 68.11,42.002 C21.2@68.453,41.659 ; D8.A@80.01,41.611 78.404,41.611 77.597,42.418 69.227,42.418 68.811,42.002 68.796,42.002 C21.2@68.453,41.659
3V3: C10.2 C11.2 C14.1 C15.1 C18.1 C19.1 D7.C LS1.1 R6.2 R7.2 R8.2 R21.2 R22.2 R23.2 R24.2 R32.1 R33.1 R34.1 R35.1 R42.1 R43.1 R44.1 R45.1 R52.1 R53.1 R54.1 R55.1 R62.2 R63.2 R64.2 U2.2 U3.2 U5.1 U6.14 U7.1 U8.4 U8.5 U8.11 | length 178.3
  Top Layer w0.8: v1(44.704,50.8) 44.704,50.786 v1(45.669,49.821) ; U2.2@50.165,42.248 U2.2@50.165,48.938 ; v1(54.178,49.821) 80.989,49.821 82.931,47.879 R8.2@82.931,38.227
  Bottom Layer w0.8: v1(18.336,49.292) v1(19.225,49.292) 19.225,53.515 v1(23.495,57.785) ; v1(40.259,57.785) 41.656,57.785 44.704,54.737 v1(44.704,50.8) 44.704,50.786 v1(45.669,49.821) v1(47.066,49.821) v1(52.908,49.821) v1(54.178,49.821) ; v1@45.42,13.337 46.484,13.337 47.86,14.713 51.67,14.713 U8.5@53.848,16.891 ; v1(73.112,7.841) 90.772,7.841 95.885,12.954 95.885,25.527 104.013,33.655 ; v1(81.319,38.212) 81.432,38.1 83.185,38.1 84.582,36.703 100.965,36.703 104.013,33.655 ; v1(113.332,42.18) v1(113.332,40.91) 113.332,35.227 111.76,33.655 104.013,33.655
  other v1: 73.112,4.412 73.112,6.317 45.466,13.335 46.457,13.332 80.43,38.212 24.886,57.704 41.808,57.731 76.733,57.731 93.878,57.731 111.277,57.731 57.785,57.785 59.436,57.785 75.311,57.785 92.329,57.785 109.855,57.785
5V: C9.2 C12.2 C13.2 C24.1 C25.1 D2.C D6.C PS1.1 R5.2 R26.2 U2.3 U4.5 U8.1 U15.25 | length 227
  Top Layer w0.4: U4.5@43.942,7.478 v1(43.942,8.636) ; D6.C@49.149,7.051 49.158,7.06 49.158,8.637 v1(49.166,8.645)
  Top Layer w0.8: C24.1@21.971,33.413 21.971,33.428 22.041,33.498 22.993,33.498 v1@23.495,34 ; v1@23.597,33.997 23.622,34.023 v1(23.622,34.036) v1(23.622,35.179) ; v1(43.032,42.061) 43.044,42.049 C12.2@45.72,42.049 45.72,40.894 46.863,39.751 51.308,39.751 52.39,40.833 52.39,42.183 U2.3@52.455,42.248 ; C13.2@54.991,42.176 54.991,42.191 55.061,42.261 55.465,42.261 55.495,42.291 v1(57.785,42.291) ; R5.2@96.393,6.567 96.393,6.542 96.443,6.492 97.013,6.492 v1(97.917,5.588)
  Bottom Layer w0.8: v1(23.622,34.036) 23.622,34.597 23.632,34.608 23.632,35.169 21.844,36.957 ; v1(43.032,42.061) 41.91,43.183 41.91,49.315 36.415,54.81 23.949,54.81 21.844,52.705 21.844,36.957 ; U8.1@43.688,16.891 43.688,15.24 ; v1(43.942,8.636) 43.688,8.89 43.688,15.24 ; v1@43.951,8.645 v1(49.166,8.645) ; v1(57.785,42.291) 81.407,42.291 84.282,39.416 v1(89.91,39.416) ; v1(97.917,5.588) 96.52,6.985 96.52,10.541 98.171,12.192 98.171,24.765 105.029,31.623 v1(109.855,31.623) ; 21.844,36.957 10.414,36.957 8.205,34.748 8.205,19.227 17.272,10.16 31.877,10.16 33.02,11.303 39.751,11.303 43.688,15.24
  other v1: 89.91,38.146 91.18,38.146 91.18,39.416
A: F2.2 GDT1.2 J5.2 | length 29.5
  Top Layer w0.324: GDT1.2@113.284,16.002 112.903,15.621 J5.2@112.903,8.001 112.903,5.715 113.792,4.826 117.475,4.826 118.618,5.969 118.618,8.636 120.015,10.033 122.283,10.033 125.95,13.7 F2.2@126.365,13.7
ANT: J12.1 U15.12 | length 14.2
  Top Layer w0.535: U15.12@2.54,13.208 7.239,13.208 10.287,10.16 J12.1@10.287,4.953
AUX: L_AUX.1 U3.6 U8.12 U15.24 | length 97.8
  Top Layer w0.324: v1@16.231,32.004 16.178,32.057 15.949,32.057 14.859,33.147 14.859,39.139 16.968,41.248 L_AUX.1@17.018,41.248 ; v1@16.28,32.028 16.292,32.016 18.148,32.016 U15.24@18.16,32.028 ; v1(38.164,18.087) 38.19,18.061 U3.6@39.635,18.061
  Bottom Layer w0.324: v1(16.256,32.004) 16.213,31.961 15.836,31.961 14.732,30.857 14.732,18.796 21.463,12.065 26.67,12.065 28.067,13.462 37.973,13.462 39.116,14.605 39.116,17.135 v1(38.164,18.087) 38.239,18.087 38.44,18.288 50.927,18.288 54.864,22.225 66.294,22.225 U8.12@71.628,16.891
AY: U6.2 U6.3 | length 1.3
  Top Layer w0.254: U6.3@75.311,45.484 U6.2@76.581,45.484
B: F1.2 GDT1.1 J5.1 | length 17.9
  Top Layer w0.324: GDT1.1@116.584,16.002 116.584,8.13 J5.1@116.713,8.001 119.761,11.049 121.412,11.049 123.107,12.744 123.107,13.392 123.416,13.7 F1.2@123.825,13.7
BOOT: BOOT.2 C16.2 R6.1 U3.27 | length 85.4
  Top Layer w0.254: v1(11.684,25.654) 15.748,21.59 15.748,11.303 16.764,10.287 23.368,10.287 25.06,8.595 BOOT.2@25.06,7.239 25.26,7.239 28.689,3.81 36.445,3.81 v1(37.461,4.826) ; v1(20.193,31.877) 21.512,30.558 21.512,28.544 21.835,28.221 U3.27@22.135,28.221 ; C16.2@49.137,15.113 49.239,15.011 R6.1@49.239,13.462 v1(50.165,13.462)
  Bottom Layer w0.254: v1(11.684,25.654) 11.684,32.258 12.573,33.147 18.923,33.147 v1(20.193,31.877) ; v1(37.461,4.826) 47.498,4.826 50.546,7.874 50.546,13.081 v1(50.165,13.462)
CH1: R11.2 R38.1 | length 15.7
  Top Layer w0.324: R38.1@16.002,58.838 16.002,54.737 17.272,53.467 22.225,53.467 23.965,51.727 R11.2@23.965,49.366
CH2: R13.2 R48.1 | length 14.4
  Top Layer w0.324: R13.2@25.776,49.366 25.776,50.922 29.972,55.118 33.02,55.118 33.528,55.626 33.528,57.822 33.181,58.169 33.181,58.294 33.018,58.457 R48.1@32.893,58.457
CH3: R18.2 R58.1 | length 30.4
  Top Layer w0.324: R18.2@27.587,49.366 27.587,50.447 31.496,54.356 50.038,54.356 51.181,55.499 51.181,57.695 R58.1@50.165,58.711
CH4: R12.2 R39.1 | length 46
  Top Layer w0.324: R12.2@29.398,49.366 29.398,50.099 32.893,53.594 66.929,53.594 68.707,55.372 68.707,58.076 R39.1@67.945,58.838
CH5: R14.2 R49.1 | length 60.1
  Top Layer w0.324: R14.2@31.209,49.366 31.209,50.177 33.737,52.705 82.296,52.705 85.09,55.499 R49.1@85.09,58.711
CH6: R19.2 R59.1 | length 75.9
  Top Layer w0.324: R19.2@33.02,49.366 33.02,50.177 34.786,51.943 85.471,51.943 88.392,54.864 102.108,54.864 102.87,55.626 R59.1@102.87,58.584
COM1: J6.2 K1.1 | length 25.8
  Bottom Layer w1.5: K1.1@25.4,71.152 25.4,83.947 33.667,92.214 33.667,93.357 J6.2@33.782,93.472
COM2: J8.2 K3.1 | length 24.4
  Bottom Layer w1.5: K3.1@41.408,71.152 41.408,85.35 45.085,89.027 45.085,91.913 46.482,93.31 J8.2@46.482,93.472
COM3: J10.2 K5.1 | length 23.1
  Bottom Layer w1.5: K5.1@57.416,71.152 57.416,81.429 59.182,83.195 J10.2@59.182,93.472
COM4: J7.2 K2.1 | length 23
  Bottom Layer w1.5: J7.2@71.882,93.472 71.882,83.083 73.425,81.541 K2.1@73.425,71.152
COM5: J9.2 K4.1 | length 24.3
  Bottom Layer w1.5: J9.2@84.582,93.472 84.592,93.462 84.592,90.508 86.725,88.376 86.725,88.281 89.281,85.725 89.281,77.93 89.433,77.778 K4.1@89.433,71.152
COM6: J11.2 K6.1 | length 25.7
  Bottom Layer w1.5: J11.2@97.282,93.472 97.282,93.31 97.582,93.01 97.582,92.791 103.886,86.487 103.886,79.327 105.441,77.772 K6.1@105.441,71.152